# Altium PCB PWR Board 10A.PcbDoc (part 5 of 10)
Units mm, origin at the board's own origin, x right, y up, seen from the top; angles counter-clockwise.
Board outline 355 x 325 mm, 4 copper layers (Top Layer, Layer 1, Layer 2, Bottom Layer), stack 1.636 mm thick; 617 components, 308 nets, 1518 pads, 1199 vias.
Unrouted connection lines stored in the file: 361.
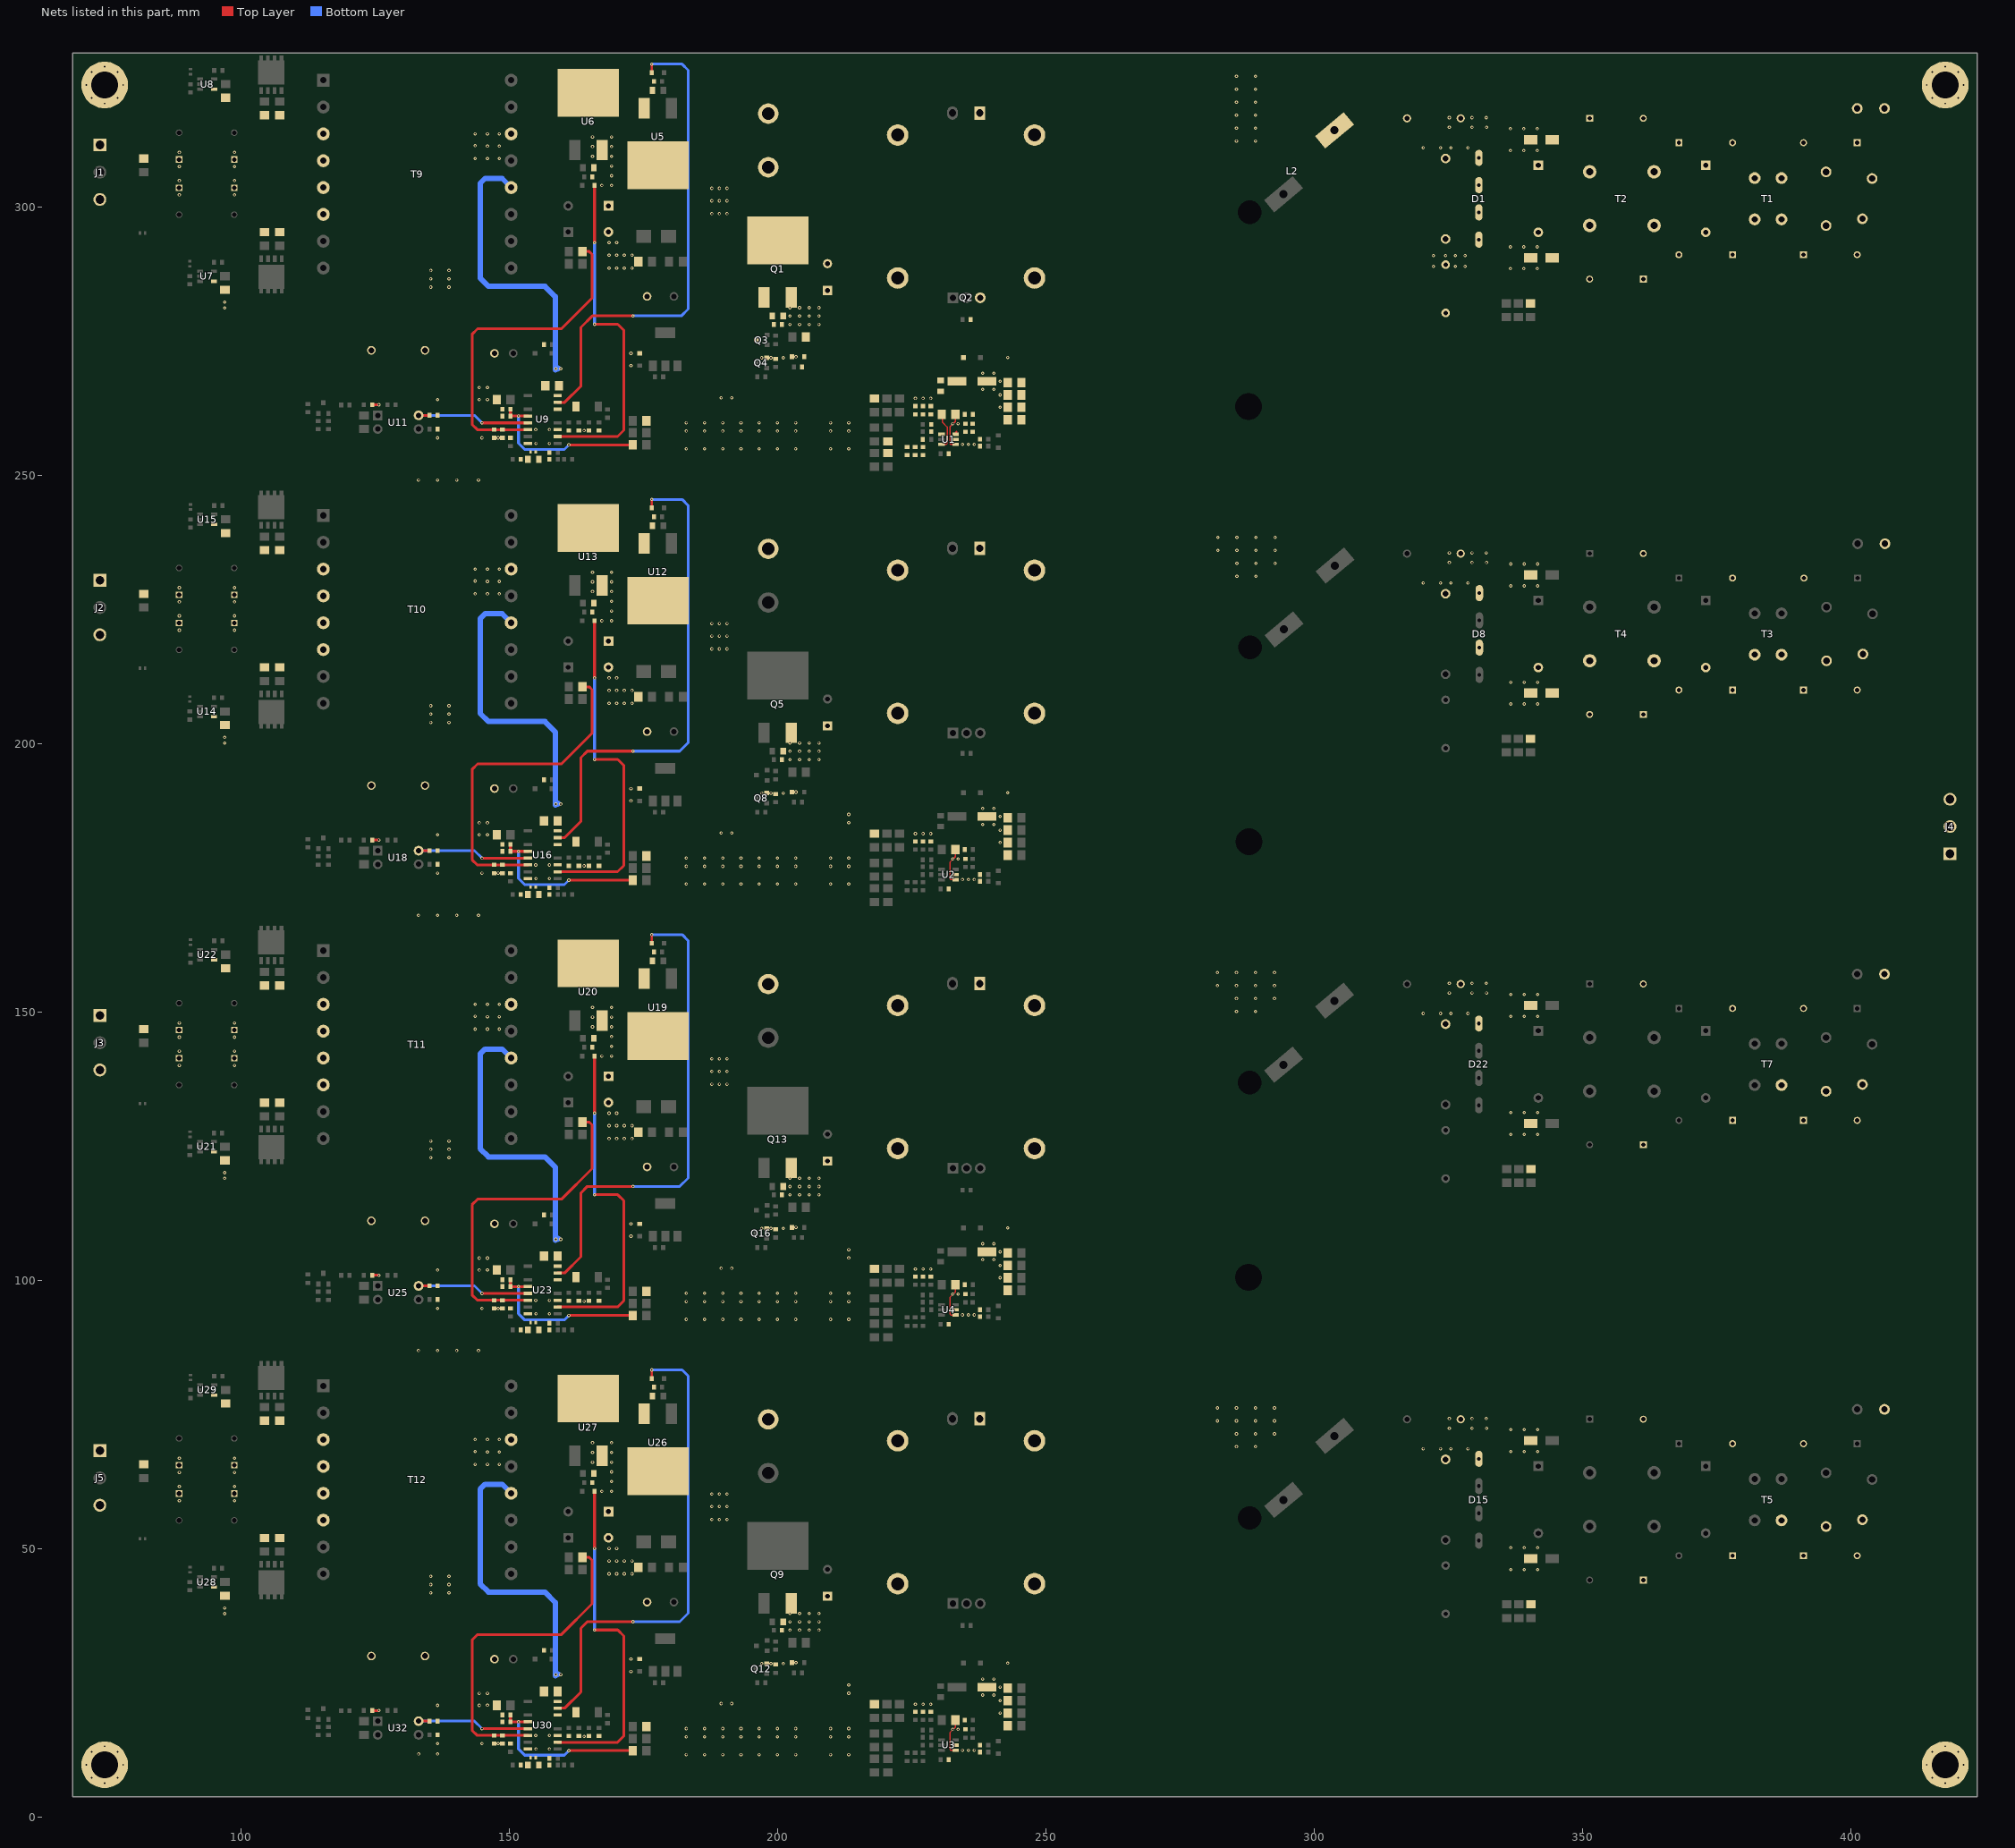
[diagram p4: the nets of this part, all layers, seen from the top]

## Part data (continued)
R120 R150 R180 R210: library part RC0603FR-072R2L, "RES 2.2 OHM 1% 1/10W 0603", Case Code (Imperial)=0603, Case Code (Metric)=1608, LCSC Part Number=C112307, Manufacturer=Yageo, Max Operating Temperature=155°C, Max Power Dissipation=100mW, Min Operating Temperature=-55°C, Package Quantity=1, Resistance Tolerance=1%, Resistor Type="Thick Film", Temperature Coefficient=200ppm/°C, Voltage Rating=50V, Case/Package=0603, ComponentLink1Description=https://datasheet.ciiva.com/11808/0900766b80f96399-11808160.pdf?src-supplier=Rs, ComponentLink1URL=https://datasheet.ciiva.com/11808/0900766b80f96399-11808160.pdf?src-supplier=Rs, ComponentLink2Description=https://datasheet.ciiva.com/2554/pyu-r-int-thick-7-2554421.pdf?src-supplier=Digikey, ComponentLink2URL=https://datasheet.ciiva.com/2554/pyu-r-int-thick-7-2554421.pdf?src-supplier=Digikey, ComponentLink3Description=https://datasheet.ciiva.com/2554/pyu-r-int-thick-7-2554422.pdf?src-supplier=Digikey, ComponentLink3URL=https://datasheet.ciiva.com/2554/pyu-r-int-thick-7-2554422.pdf?src-supplier=Digikey, ComponentLink4Description=https://datasheet.ciiva.com/2554/pyu-r-int-thick-7-2554420.pdf?src-supplier=Digikey, ComponentLink4URL=https://datasheet.ciiva.com/2554/pyu-r-int-thick-7-2554420.pdf?src-supplier=Digikey, Depth=0.8mm, Features="Moisture Resistant", Height=0.022inch, Item Type=Resistors, Lead Free="Lead Free", Length=0.063inch, Manufacturer Part Number=RC0603FR-072R2L, Number of Terminations=2, Packaging="Tape and Reel", Pins=2, Power Rating=100mW, Pricing="1=0.1, 10=0.029, 50=0.0188, 100=0.0158, 500=0.01094, 1000=0.00947 (USD)", Reach SVHC Compliant=No, RoHS=Yes, RoHS Compliant=Yes, Series=RC, Stock=331140, Supplier=Digikey, Technology="THICK FILM", Termination=SMD/SMT, Tolerance=1%, Voltage Rating (DC)=50V, Width=0.031inch
R121 R122 R124 R151 R152 R154 R181 R182 R184 R211 R212 R214: library part RC1206FR-074M99L, "RES 4.99M OHM 1% 1/4W 1206", Case Code (Imperial)=1206, Case Code (Metric)=3216, LCSC Part Number=C488845, Manufacturer=Yageo, Max Operating Temperature=155°C, Max Power Dissipation=250mW, Min Operating Temperature=-55°C, Package Quantity=1, Temperature Coefficient=100ppm/°C, Tolerance=1%, Voltage Rating=200V, Case/Package=1206, ComponentLink1Description=https://datasheet.ciiva.com/2521/pyu-rc1206-51-rohs-l-4-2521020.pdf?src-supplier=Digikey, ComponentLink1URL=https://datasheet.ciiva.com/2521/pyu-rc1206-51-rohs-l-4-2521020.pdf?src-supplier=Digikey, ComponentLink2Description=https://datasheet.ciiva.com/2521/pyu-rc1206-51-rohs-l-4-2521021.pdf?src-supplier=Digikey, ComponentLink2URL=https://datasheet.ciiva.com/2521/pyu-rc1206-51-rohs-l-4-2521021.pdf?src-supplier=Digikey, ComponentLink3Description=https://datasheet.ciiva.com/2521/pyu-rc1206-51-rohs-l-4-2521019.pdf?src-supplier=Digikey, ComponentLink3URL=https://datasheet.ciiva.com/2521/pyu-rc1206-51-rohs-l-4-2521019.pdf?src-supplier=Digikey, Contact Plating=Tin,Matte, Features="Moisture Resistant", Height=0.026inch, Item Type=Resistors, Lead Free="Lead Free", Length=0.122inch, Manufacturer Part Number=RC1206FR-074M99L, Number of Terminations=2, Packaging="Tape and Reel", Power Rating=250mW, Pricing="1=0.1, 10=0.038, 50=0.0244, 100=0.0206, 500=0.01434, 1000=0.01248 (USD)", RoHS=Yes, RoHS Compliant=Yes, Series=RC, Stock=11560, Supplier=Digikey, Termination=SMD/SMT, Voltage Rating (DC)=200V, Width=0.063inch
R123 R153 R183 R213: library part RC0603FR-07274KL, "RES 274K OHM 1% 1/10W 0603", LCSC Part Number=C482818, Manufacturer=Yageo, ComponentLink1Description=https://datasheet.ciiva.com/2454/pyu-r-int-thick-7-2454960.pdf?src-supplier=Digikey, ComponentLink1URL=https://datasheet.ciiva.com/2454/pyu-r-int-thick-7-2454960.pdf?src-supplier=Digikey, ComponentLink2Description=https://datasheet.ciiva.com/2454/pyu-r-int-thick-7-2454961.pdf?src-supplier=Digikey, ComponentLink2URL=https://datasheet.ciiva.com/2454/pyu-r-int-thick-7-2454961.pdf?src-supplier=Digikey, ComponentLink3Description=https://datasheet.ciiva.com/2454/pyu-r-int-thick-7-2454962.pdf?src-supplier=Digikey, ComponentLink3URL=https://datasheet.ciiva.com/2454/pyu-r-int-thick-7-2454962.pdf?src-supplier=Digikey, Item Type=Resistors, Manufacturer Part Number=RC0603FR-07274KL, Pricing="1=0.1, 10=0.019, 50=0.0114, 100=0.0094, 500=0.00632, 1000=0.0054 (USD)", RoHS=Yes, Stock=204071, Supplier=Digikey
R125 R155 R185 R215: library part CRCW0603100RFKEA, "RES SMD 100 OHM 1% 1/10W 0603", Case Code (Imperial)=0603, Case Code (Metric)=1608, LCSC Part Number=C844917, Manufacturer="Vishay Dale", Max Operating Temperature=155°C, Max Power Dissipation=100mW, Min Operating Temperature=-55°C, Package Quantity=10, Ratings=AEC-Q200, Resistance Tolerance=1%, Resistor Type="Thick Film", Temperature Coefficient=100ppm/°C, Voltage Rating=75V, Case/Package=0603, ComponentLink1Description=https://datasheet.ciiva.com/22666/1720486-22666207.pdf?src-supplier=Element14, ComponentLink1URL=https://datasheet.ciiva.com/22666/1720486-22666207.pdf?src-supplier=Element14, ComponentLink2Description=https://datasheet.ciiva.com/26316/fld-crcw-e3-data-en-26316566.pdf?src-supplier=Distrelec, ComponentLink2URL=https://datasheet.ciiva.com/26316/fld-crcw-e3-data-en-26316566.pdf?src-supplier=Distrelec, ComponentLink3Description=https://datasheet.ciiva.com/22673/1697337-22673066.pdf?src-supplier=Element14, ComponentLink3URL=https://datasheet.ciiva.com/22673/1697337-22673066.pdf?src-supplier=Element14, ComponentLink4Description=https://datasheet.ciiva.com/2465/dcrcwe3-2465544.pdf?src-supplier=Digikey, ComponentLink4URL=https://datasheet.ciiva.com/2465/dcrcwe3-2465544.pdf?src-supplier=Digikey, ComponentLink5Description=https://datasheet.ciiva.com/2465/dcrcwe3-2465545.pdf?src-supplier=Digikey, ComponentLink5URL=https://datasheet.ciiva.com/2465/dcrcwe3-2465545.pdf?src-supplier=Digikey, ComponentLink6Description=https://datasheet.ciiva.com/2465/dcrcwe3-2465543.pdf?src-supplier=Digikey, ComponentLink6URL=https://datasheet.ciiva.com/2465/dcrcwe3-2465543.pdf?src-supplier=Digikey, ComponentLink7Description=https://datasheet.ciiva.com/16721/70201119-16721486.pdf?src-supplier=Allied+Electronics, ComponentLink7URL=https://datasheet.ciiva.com/16721/70201119-16721486.pdf?src-supplier=Allied+Electronics, ComponentLink8Description=https://datasheet.ciiva.com/16787/70201119-16787964.pdf?src-supplier=Allied+Electronics, ComponentLink8URL=https://datasheet.ciiva.com/16787/70201119-16787964.pdf?src-supplier=Allied+Electronics, ComponentLink9Description=https://datasheet.ciiva.com/5550/dcrcwe3-109170-5550286.pdf?src-supplier=Mouser, ComponentLink9URL=https://datasheet.ciiva.com/5550/dcrcwe3-109170-5550286.pdf?src-supplier=Mouser, ComponentLink10Description=https://datasheet.ciiva.com/16199/dcrcwe3-16199102.pdf?src-supplier=Future+Electronics, ComponentLink10URL=https://datasheet.ciiva.com/16199/dcrcwe3-16199102.pdf?src-supplier=Future+Electronics, Construction=Rectangular, Depth=0.85mm, Features="Automotive AEC-Q200", Height=0.02inch, Item Type=Resistors, Lead Free=5697LeadFree, Length=1.55mm, Manufacturer Part Number=CRCW0603100RFKEA, Military Standard=Not, Number of Terminations=2, Packaging="Tape and Reel", Pins=2NUMBER, Power Rating=100mW, Pricing="1=0.1, 10=0.017, 50=0.017, 100=0.01, 1000=0.008, 10000=0.004 (USD)", Reach SVHC Compliant=Unknown, RoHS=Yes, RoHS Compliant=Yes, Series=CRCW, Stock=584918, Supplier=Mouser, Termination=SMD/SMT, Tolerance=1%, Voltage Rating (DC)=75V, Weight=7.1E-05oz, Width=0.033inch
R126 R156 R186 R216: library part RT0603BRE07301KL, "RES SMD 301K OHM 0.1% 1/10W 0603", Case/Package=0603, LCSC Part Number=C326750, Manufacturer=Yageo, Max Operating Temperature=125°C, Max Power Dissipation=100mW, Min Operating Temperature=-55°C, Package Quantity=5000, Resistance=301kR, Resistor Type="Thin Film", Supplier Part Number 1=603-RT0603BRE07301KL, Temperature Coefficient=50ppm/°C, Tolerance=0.1%, Voltage Rating (DC)=50V, Category="Chip SMD Resistors", ComponentLink1Description=https://datasheet.ciiva.com/2584/pyu-rt-1-to-0-05-rohs-l-5-2584420.pdf?src-supplier=Digi-Key, ComponentLink1URL=https://datasheet.ciiva.com/2584/pyu-rt-1-to-0-05-rohs-l-5-2584420.pdf?src-supplier=Digi-Key, Height=0.022inch, Item Type=Resistor, Lead Free="Lead Free", Length=0.063inch, Manufacturer Part Number=RT0603BRE07301KL, Number of Terminations=2, Packaging="Tape and Reel", Pricing 1="1=0.42000, 10=0.30200, 50=0.30200, 100=0.12100, 1000=0.06000, 10000=0.04900 (USD)", RoHS=Yes, RoHS Compliant=Yes, Series=RT, Stock 1=2800, Supplier 1=Mouser, Width=0.031inch
R127 R157 R187 R217: library part CRCW060337K4FKEA, "RES SMD 37.4K OHM 1% 1/10W 0603", LCSC Part Number=C844359, Manufacturer=Vishay, ComponentLink1Description=https://datasheet.ciiva.com/5541/dcrcwe3-109170-5541061.pdf?src-supplier=Mouser, ComponentLink1URL=https://datasheet.ciiva.com/5541/dcrcwe3-109170-5541061.pdf?src-supplier=Mouser, ComponentLink2Description=https://datasheet.ciiva.com/22705/1697337-22705851.pdf?src-supplier=Element14, ComponentLink2URL=https://datasheet.ciiva.com/22705/1697337-22705851.pdf?src-supplier=Element14, ComponentLink3Description=https://datasheet.ciiva.com/16770/70201119-16770680.pdf?src-supplier=Allied+Electronics, ComponentLink3URL=https://datasheet.ciiva.com/16770/70201119-16770680.pdf?src-supplier=Allied+Electronics, ComponentLink4Description=https://datasheet.ciiva.com/7671/1697337-7671645.pdf?src-supplier=Element14, ComponentLink4URL=https://datasheet.ciiva.com/7671/1697337-7671645.pdf?src-supplier=Element14, ComponentLink5Description=https://datasheet.ciiva.com/7671/1697337-7671646.pdf?src-supplier=Element14, ComponentLink5URL=https://datasheet.ciiva.com/7671/1697337-7671646.pdf?src-supplier=Element14, ComponentLink6Description=https://datasheet.ciiva.com/3257/dcrcwe3-3257503.pdf?src-supplier=Avnet, ComponentLink6URL=https://datasheet.ciiva.com/3257/dcrcwe3-3257503.pdf?src-supplier=Avnet, ComponentLink7Description=https://datasheet.ciiva.com/7792/125364-7792237.pdf?src-supplier=Element14, ComponentLink7URL=https://datasheet.ciiva.com/7792/125364-7792237.pdf?src-supplier=Element14, ComponentLink8Description=https://datasheet.ciiva.com/16203/dcrcwe3-16203015.pdf?src-supplier=Future+Electronics, ComponentLink8URL=https://datasheet.ciiva.com/16203/dcrcwe3-16203015.pdf?src-supplier=Future+Electronics, ComponentLink9Description=https://datasheet.ciiva.com/2465/dcrcwe3-2465762.pdf?src-supplier=Digikey, ComponentLink9URL=https://datasheet.ciiva.com/2465/dcrcwe3-2465762.pdf?src-supplier=Digikey, ComponentLink10Description=https://datasheet.ciiva.com/2465/dcrcwe3-2465763.pdf?src-supplier=Digikey, ComponentLink10URL=https://datasheet.ciiva.com/2465/dcrcwe3-2465763.pdf?src-supplier=Digikey, ComponentLink11Description=https://datasheet.ciiva.com/2465/dcrcwe3-2465764.pdf?src-supplier=Digikey, ComponentLink11URL=https://datasheet.ciiva.com/2465/dcrcwe3-2465764.pdf?src-supplier=Digikey, ComponentLink12Description=https://datasheet.ciiva.com/8337/dcrcwe3-8337085.pdf?src-supplier=Avnet, ComponentLink12URL=https://datasheet.ciiva.com/8337/dcrcwe3-8337085.pdf?src-supplier=Avnet, Item Type=Resistor, Manufacturer Part Number=CRCW060337K4FKEA, Pricing="1=0.1, 10=0.026, 50=0.0166, 100=0.014, 500=0.00954, 1000=0.00824 (USD)", RoHS=Yes, Stock=9664, Supplier=Digikey
R128 R158 R188 R218: library part CRCW060344K2FKEA, "RES SMD 44.2K OHM 1% 1/10W 0603", LCSC Part Number=C844365, Manufacturer=Vishay, Voltage Rating (DC)=75V, ComponentLink1Description=https://datasheet.ciiva.com/11812/0900766b80d98afc-11812612.pdf?src-supplier=Rs, ComponentLink1URL=https://datasheet.ciiva.com/11812/0900766b80d98afc-11812612.pdf?src-supplier=Rs, ComponentLink2Description=https://datasheet.ciiva.com/2466/dcrcwe3-2466281.pdf?src-supplier=Digikey, ComponentLink2URL=https://datasheet.ciiva.com/2466/dcrcwe3-2466281.pdf?src-supplier=Digikey, ComponentLink3Description=https://datasheet.ciiva.com/2466/dcrcwe3-2466282.pdf?src-supplier=Digikey, ComponentLink3URL=https://datasheet.ciiva.com/2466/dcrcwe3-2466282.pdf?src-supplier=Digikey, ComponentLink4Description=https://datasheet.ciiva.com/2466/dcrcwe3-2466283.pdf?src-supplier=Digikey, ComponentLink4URL=https://datasheet.ciiva.com/2466/dcrcwe3-2466283.pdf?src-supplier=Digikey, ComponentLink5Description=https://datasheet.ciiva.com/15159/getdatasheetpartid-52050-15159597.pdf?src-supplier=Verical, ComponentLink5URL=https://datasheet.ciiva.com/15159/getdatasheetpartid-52050-15159597.pdf?src-supplier=Verical, ComponentLink6Description=https://datasheet.ciiva.com/16507/dcrcwe3-16507773.pdf?src-supplier=Future+Electronics, ComponentLink6URL=https://datasheet.ciiva.com/16507/dcrcwe3-16507773.pdf?src-supplier=Future+Electronics, ComponentLink7Description=https://datasheet.ciiva.com/22705/1697337-22705852.pdf?src-supplier=Element14, ComponentLink7URL=https://datasheet.ciiva.com/22705/1697337-22705852.pdf?src-supplier=Element14, ComponentLink8Description=https://datasheet.ciiva.com/7671/1697337-7671657.pdf?src-supplier=Element14, ComponentLink8URL=https://datasheet.ciiva.com/7671/1697337-7671657.pdf?src-supplier=Element14, ComponentLink9Description=https://datasheet.ciiva.com/7671/1697337-7671658.pdf?src-supplier=Element14, ComponentLink9URL=https://datasheet.ciiva.com/7671/1697337-7671658.pdf?src-supplier=Element14, ComponentLink10Description=https://datasheet.ciiva.com/16772/70201119-16772373.pdf?src-supplier=Allied+Electronics, ComponentLink10URL=https://datasheet.ciiva.com/16772/70201119-16772373.pdf?src-supplier=Allied+Electronics, ComponentLink11Description=https://datasheet.ciiva.com/22872/70201119-22872024.pdf?src-supplier=Allied+Electronics, ComponentLink11URL=https://datasheet.ciiva.com/22872/70201119-22872024.pdf?src-supplier=Allied+Electronics, Item Type=Resistor, Lead Free=5697LeadFree, Manufacturer Part Number=CRCW060344K2FKEA, Pricing="1=0.1, 10=0.026, 50=0.0166, 100=0.014, 500=0.00954, 1000=0.00824 (USD)", RoHS=Yes, Stock=24979, Supplier=Digikey
R129 R159 R189 R219: library part RC0603JR-070RL, "RES 0 OHM JUMPER 1/10W 0603", Case Code (Imperial)=0603, Case Code (Metric)=1608, LCSC Part Number=C95177, Manufacturer=Yageo, Max Operating Temperature=155°C, Max Power Dissipation=100mW, Min Operating Temperature=-55°C, Package Quantity=5000, Resistance=0mR, Resistance Tolerance=5%, Resistor Type="Thick Film", Supplier Part Number 1=311-0.0GRCT-ND, Temperature Coefficient=200ppm/°C, Tolerance=1%, Voltage Rating=50V, Case/Package=0603, Category="Chip SMD Resistors", Construction=Rectangular, Contact Plating=Tin,Matte, Depth=0.8mm, Features="Moisture Resistant", Height=0.45mm, Item Type=Resistor, Lead Free="Lead Free", Length=1.6mm, Manufacturer Part Number=RC0603JR-070RL, Military Standard=Not, Number of Pins=2, Number of Terminations=2, Packaging="Tape and Reel", Power Rating=100mW, Pricing 1="1=0.10000, 10=0.01700, 25=0.01240, 50=0.00960, 100=0.00700, 250=0.00536, 500=0.00430, 1000=0.00316 (USD)", Radiation Hardening=No, Reach SVHC Compliant="No SVHC", RoHS=Yes, RoHS Compliant=Yes, Series=RC, Size Code=0603, Stock 1=18081776, Supplier 1=Digi-Key, Technology="THICK FILM", Termination=SMD/SMT, Voltage Rating (DC)=50V, Width=0.8mm
R130 R131 R160 R161 R190 R191 R220 R221: library part AC0603FR-07324KL, "RES SMD 324K OHM 1% 1/10W 0603", Case Code (Imperial)=0603, Case Code (Metric)=1608, LCSC Part Number=C227818, Manufacturer=Yageo, Max Operating Temperature=155°C, Max Power Dissipation=100mW, Min Operating Temperature=-55°C, Package Quantity=1, Temperature Coefficient=100ppm/°C, Tolerance=1%, Voltage Rating=50V, Case/Package=0603, ComponentLink1Description=http://www.mouser.com/ds/2/447/yageodocoutput-1111992.pdf?src-supplier=Mouser, ComponentLink1URL=http://www.mouser.com/ds/2/447/yageodocoutput-1111992.pdf?src-supplier=Mouser, ComponentLink2Description=https://www.yageo.com/upload/media/product/productsearch/datasheet/rchip/PYu-AC_51_RoHS_L_7.pdf?src-supplier=Digikey, ComponentLink2URL=https://www.yageo.com/upload/media/product/productsearch/datasheet/rchip/PYu-AC_51_RoHS_L_7.pdf?src-supplier=Digikey, Features="Moisture Resistant,Automotive AEC-Q200,Anti-Sulfur", Height=0.022inch, Item Type=Resistors, Length=0.063inch, Manufacturer Part Number=AC0603FR-07324KL, Number of Terminations=2, Packaging="Tape and Reel", Power Rating=100mW, Pricing="1=0.1, 10=0.021, 50=0.013, 100=0.0108, 500=0.00734, 1000=0.00633 (USD)", RoHS=Yes, RoHS Compliant=Yes, Series=AC, Stock=5000, Supplier=Digikey, Termination=SMD/SMT, Width=0.031inch
R132 R162 R192 R222: library part CRCW060320R0FKEA, "RES SMD 20 OHM 1% 1/10W 0603", Case Code (Imperial)=0603, Case Code (Metric)=1608, LCSC Part Number=C844755, Manufacturer=Vishay, Max Operating Temperature=155°C, Max Power Dissipation=100mW, Min Operating Temperature=-55°C, Package Quantity=10, Ratings=AEC-Q200, Resistance Tolerance=1%, Resistor Type="Thick Film", Temperature Coefficient=100ppm/°C, Voltage Rating=75V, Case/Package=0603, ComponentLink1Description=https://datasheet.ciiva.com/11810/0900766b80d98afc-11810778.pdf?src-supplier=Rs, ComponentLink1URL=https://datasheet.ciiva.com/11810/0900766b80d98afc-11810778.pdf?src-supplier=Rs, ComponentLink2Description=https://datasheet.ciiva.com/7748/1533075-7748858.pdf?src-supplier=Element14, ComponentLink2URL=https://datasheet.ciiva.com/7748/1533075-7748858.pdf?src-supplier=Element14, ComponentLink3Description=https://datasheet.ciiva.com/2465/dcrcwe3-2465673.pdf?src-supplier=Digikey, ComponentLink3URL=https://datasheet.ciiva.com/2465/dcrcwe3-2465673.pdf?src-supplier=Digikey, ComponentLink4Description=https://datasheet.ciiva.com/2465/dcrcwe3-2465674.pdf?src-supplier=Digikey, ComponentLink4URL=https://datasheet.ciiva.com/2465/dcrcwe3-2465674.pdf?src-supplier=Digikey, ComponentLink5Description=https://datasheet.ciiva.com/16776/70201119-16776202.pdf?src-supplier=Allied+Electronics, ComponentLink5URL=https://datasheet.ciiva.com/16776/70201119-16776202.pdf?src-supplier=Allied+Electronics, ComponentLink6Description=https://datasheet.ciiva.com/26316/fld-crcw-e3-data-en-26316589.pdf?src-supplier=Distrelec, ComponentLink6URL=https://datasheet.ciiva.com/26316/fld-crcw-e3-data-en-26316589.pdf?src-supplier=Distrelec, ComponentLink7Description=https://datasheet.ciiva.com/2465/dcrcwe3-2465672.pdf?src-supplier=Digikey, ComponentLink7URL=https://datasheet.ciiva.com/2465/dcrcwe3-2465672.pdf?src-supplier=Digikey, ComponentLink8Description=https://datasheet.ciiva.com/16788/70201119-16788011.pdf?src-supplier=Allied+Electronics, ComponentLink8URL=https://datasheet.ciiva.com/16788/70201119-16788011.pdf?src-supplier=Allied+Electronics, ComponentLink9Description=https://datasheet.ciiva.com/5548/dcrcwe3-109170-5548022.pdf?src-supplier=Mouser, ComponentLink9URL=https://datasheet.ciiva.com/5548/dcrcwe3-109170-5548022.pdf?src-supplier=Mouser, ComponentLink10Description=https://datasheet.ciiva.com/3257/dcrcwe3-3257244.pdf?src-supplier=Avnet, ComponentLink10URL=https://datasheet.ciiva.com/3257/dcrcwe3-3257244.pdf?src-supplier=Avnet, ComponentLink11Description=https://datasheet.ciiva.com/16374/dcrcwe3-16374634.pdf?src-supplier=Future+Electronics, ComponentLink11URL=https://datasheet.ciiva.com/16374/dcrcwe3-16374634.pdf?src-supplier=Future+Electronics, ComponentLink12Description=https://datasheet.ciiva.com/3257/dcrcwe3-3257243.pdf?src-supplier=Avnet, ComponentLink12URL=https://datasheet.ciiva.com/3257/dcrcwe3-3257243.pdf?src-supplier=Avnet, Construction=Rectangular, Contact Plating=Tin, Depth=0.85mm, Features="Automotive AEC-Q200", Height=0.45mm, Item Type=Resistors, Lead Free="Lead Free", Length=1.55mm, Manufacturer Part Number=CRCW060320R0FKEA, Military Standard=Not, Number of Terminations=2, Packaging="Tape and Reel", Power Rating=100mW, Pricing="1=0.1, 10=0.026, 50=0.0166, 100=0.014, 500=0.00954, 1000=0.00824 (USD)", Radiation Hardening=No, Reach SVHC Compliant=Unknown, RoHS=Yes, RoHS Compliant=Yes, Series=CRCW, Stock=100733, Supplier=Digikey, Technology="THICK FILM", Termination=SMD/SMT, Tolerance=1%, Voltage Rating (DC)=75V, Weight=7.1E-05oz, Width=0.033inch
R133 R163 R193 R223: library part RC1206FR-0720KL, "RES 20K OHM 1% 1/4W 1206", LCSC Part Number=C114940, Manufacturer=Yageo, Voltage Rating (DC)=200V, ComponentLink1Description=https://datasheet.ciiva.com/11809/0900766b80c6630a-11809460.pdf?src-supplier=Rs, ComponentLink1URL=https://datasheet.ciiva.com/11809/0900766b80c6630a-11809460.pdf?src-supplier=Rs, ComponentLink2Description=https://datasheet.ciiva.com/16746/pyu-rc1206-51-rohs-l-4-16746334.pdf?src-supplier=Future+Electronics, ComponentLink2URL=https://datasheet.ciiva.com/16746/pyu-rc1206-51-rohs-l-4-16746334.pdf?src-supplier=Future+Electronics, Item Type=Resistors, Lead Free=5697LeadFree, Manufacturer Part Number=RC1206FR-0720KL, Pricing="1=0.1, 10=0.038, 50=0.0244, 100=0.0206, 500=0.01434, 1000=0.01248 (USD)", RoHS=Yes, Stock=286094, Supplier=Digikey
R134 R164 R194 R224: library part CRCW060312K4FKEA, "RES SMD 12.4K OHM 1% 1/10W 0603", Case Code (Imperial)=0603, Case Code (Metric)=1608, Case/Package=345Case, LCSC Part Number=C844524, Manufacturer=Vishay, Max Operating Temperature=155°C, Min Operating Temperature=-55°C, Power Rating=100mW, Resistance Tolerance=1%, Resistor Type="Thick Film", Temperature Coefficient=100ppm/°C, Voltage Rating=75V, ComponentLink1Description=http://www.farnell.com/datasheets/2310790.pdf?src-supplier=Farnell, ComponentLink1URL=http://www.farnell.com/datasheets/2310790.pdf?src-supplier=Farnell, ComponentLink2Description=https://datasheet.octopart.com/CRCW060312K4FKEA-Vishay-datasheet-62317933.pdf?src-supplier=Element14, ComponentLink2URL=https://datasheet.octopart.com/CRCW060312K4FKEA-Vishay-datasheet-62317933.pdf?src-supplier=Element14, ComponentLink3Description=http://www.farnell.com/datasheets/2310790.pdf?src-supplier=Newark, ComponentLink3URL=http://www.farnell.com/datasheets/2310790.pdf?src-supplier=Newark, ComponentLink4Description=https://datasheet.octopart.com/CRCW060312K4FKEA-Vishay-datasheet-5300368.pdf?src-supplier=Future+Electronics, ComponentLink4URL=https://datasheet.octopart.com/CRCW060312K4FKEA-Vishay-datasheet-5300368.pdf?src-supplier=Future+Electronics, ComponentLink5Description=http://www.farnell.com/datasheets/2310790.pdf?src-supplier=Element14, ComponentLink5URL=http://www.farnell.com/datasheets/2310790.pdf?src-supplier=Element14, ComponentLink6Description=https://datasheet.octopart.com/CRCW060312K4FKEA-Vishay-datasheet-83961561.pdf?src-supplier=Newark, ComponentLink6URL=https://datasheet.octopart.com/CRCW060312K4FKEA-Vishay-datasheet-83961561.pdf?src-supplier=Newark, Height=500um, Item Type=Resistors, Lead Free=5697LeadFree, Manufacturer Part Number=CRCW060312K4FKEA, Packaging=13Packaging, Pins=2NUMBER, Pricing="1=0.1, 10=0.026, 50=0.0166, 100=0.014, 500=0.00954, 1000=0.00824 (USD)", RoHS=Yes, RoHS Compliant=Yes, Stock=12301, Supplier=Digikey, Tolerance=1%
RT1 RT2 RT3 RT4: "ICL 10 OHM 20% 3.5A 11.5MM", Current Rating=3.5A, LCSC Part Number=C125458, Manufacturer="TDK EPCOS", Tolerance=20%, ComponentLink1Description=https://datasheet.ciiva.com/15097/getdatasheetpartid-119550-15097692.pdf?src-supplier=Verical, ComponentLink1URL=https://datasheet.ciiva.com/15097/getdatasheetpartid-119550-15097692.pdf?src-supplier=Verical, ComponentLink2Description=https://datasheet.ciiva.com/1321/1851770-1321676.pdf?src-supplier=Element14, ComponentLink2URL=https://datasheet.ciiva.com/1321/1851770-1321676.pdf?src-supplier=Element14, Diameter=11.5mm, Item Type=Thermistors, Lead Free=5697LeadFree, Manufacturer Part Number=B57236S0100M000, Pricing="1=0.84, 10=0.78, 50=0.646, 100=0.572, 1000=0.44, 10000=0.373 (USD)", RoHS=Yes, Stock=2235, Supplier=Mouser, Thickness=6mm
T1 T3 T5 T7: "CMC 1MH 3A 2LN TH", Manufacturer="Wurth Electronics", Supplier Part Number=732-1439-ND, ComponentLink1Description=https://datasheet.ciiva.com/4952/744822301-91864-4952415.pdf?src-supplier=Mouser, ComponentLink1URL=https://datasheet.ciiva.com/4952/744822301-91864-4952415.pdf?src-supplier=Mouser, ComponentLink2Description=https://datasheet.ciiva.com/11796/0900766b804ac271-11796688.pdf?src-supplier=Rs, ComponentLink2URL=https://datasheet.ciiva.com/11796/0900766b804ac271-11796688.pdf?src-supplier=Rs, ComponentLink3Description=https://datasheet.ciiva.com/7211/70388-7211253.pdf?src-supplier=Newark, ComponentLink3URL=https://datasheet.ciiva.com/7211/70388-7211253.pdf?src-supplier=Newark, ComponentLink4Description=https://datasheet.ciiva.com/7754/1736520-7754735.pdf?src-supplier=Element14, ComponentLink4URL=https://datasheet.ciiva.com/7754/1736520-7754735.pdf?src-supplier=Element14, ComponentLink5Description=https://datasheet.ciiva.com/6216/744822301-6216281.pdf?src-supplier=Digikey, ComponentLink5URL=https://datasheet.ciiva.com/6216/744822301-6216281.pdf?src-supplier=Digikey, Item Type=Inductor, Manufacturer Part Number=744822301, Pricing="1=4.57, 10=4.5, 50=3.57, 140=3.41, 280=3.1 (USD)", RoHS=Yes, Stock=1589, Supplier=Digikey
T2 T4 T6 T8: "CMC 10MH 3A 2LN TH", Case/Package=L, Current=3A, DC Resistance (DCR)=105mR, Inductance Tolerance=30%, Manufacturer="Wurth Electronics", Max Operating Temperature=125°C, Min Operating Temperature=-40°C, Package Quantity=200, Supplier Part Number=732-1452-ND, Test Frequency=10kHz, ComponentLink1Description=https://datasheet.ciiva.com/11796/0900766b804acf58-11796710.pdf?src-supplier=Rs, ComponentLink1URL=https://datasheet.ciiva.com/11796/0900766b804acf58-11796710.pdf?src-supplier=Rs, ComponentLink2Description=https://datasheet.ciiva.com/4952/744824310-39306-4952431.pdf?src-supplier=Mouser, ComponentLink2URL=https://datasheet.ciiva.com/4952/744824310-39306-4952431.pdf?src-supplier=Mouser, ComponentLink3Description=https://datasheet.ciiva.com/6214/744824310-6214810.pdf?src-supplier=Digikey, ComponentLink3URL=https://datasheet.ciiva.com/6214/744824310-6214810.pdf?src-supplier=Digikey, ComponentLink4Description=https://datasheet.ciiva.com/7211/70411-7211262.pdf?src-supplier=Newark, ComponentLink4URL=https://datasheet.ciiva.com/7211/70411-7211262.pdf?src-supplier=Newark, ComponentLink5Description=https://datasheet.ciiva.com/7754/1736534-7754741.pdf?src-supplier=Element14, ComponentLink5URL=https://datasheet.ciiva.com/7754/1736534-7754741.pdf?src-supplier=Element14, ComponentLink6Description=https://datasheet.ciiva.com/48690/001088035-da-01-ml-we-cmb-stromkomp-netzdrossel-74482-de-en-48690603.pdf?src-supplier=Conrad, ComponentLink6URL=https://datasheet.ciiva.com/48690/001088035-da-01-ml-we-cmb-stromkomp-netzdrossel-74482-de-en-48690603.pdf?src-supplier=Conrad, Current Rating=3A, Depth=18.5mm, Height=33mm, Item Type="Common Mode Chokes", Lead Free="Lead Free", Lead Pitch=10mm, Length=27.5mm, Manufacturer Part Number=744824310, Max DC Current=3A, Mounting Technology="Through Hole,Radial", Number of Lines=2, Packaging=Bulk, Pins=4, Pricing="1=5.63, 10=5.54, 100=4.39, 250=4.2, 500=3.82 (USD)", Reach SVHC Compliant=No, RoHS=Yes, RoHS Compliant=Yes, Series=WE-CMB, Stock=278, Supplier=Digikey, Termination=Radial, Tolerance=30%, Width=18.5mm
T9 T10 T11 T12: "XFMR RES CONV AC/DC 400UH TH", Current Rating=10.4A, Frequency=120kHz, Manufacturer="Wurth Electronics", Max Operating Temperature=125°C, Min Operating Temperature=-40°C, Output Voltage=24V, Package Quantity=20, Power Rating=250W, Supplier Part Number=732-5069-ND, ComponentLink1Description=https://datasheet.ciiva.com/24142/760895741-270531-24142074.pdf?src-supplier=Mouser, ComponentLink1URL=https://datasheet.ciiva.com/24142/760895741-270531-24142074.pdf?src-supplier=Mouser, ComponentLink2Description=https://datasheet.ciiva.com/29632/760895741-29632482.pdf?src-supplier=Digikey, ComponentLink2URL=https://datasheet.ciiva.com/29632/760895741-29632482.pdf?src-supplier=Digikey, Height=27.5mm, Item Type=Transformer, Length=48mm, Manufacturer Part Number=760895741, Mounting Technology="Through Hole", Output Current=10.4A, Packaging=Tray, Pricing="1=22.74, 10=21.792, 50=20.43, 100=18.3881, 500=15.66304 (USD)", RoHS=Yes, RoHS Compliant=Yes, Series=WE-LLCR, Shielding=Unshielded, Stock=7, Supplier=Digikey, Termination=Solder, Width=35mm
U1 U2 U3 U4: "IC PFC CTRLR TRANSITION SOT23-6", LCSC Part Number=C2868631, Manufacturer="Texas Instruments", Package=SOT-23-6, ComponentLink1Description=LCSC, ComponentLink1URL=https://www.lcsc.com/product-detail/AC-DC-Controllers-Regulators_Texas-Instruments-UCC28056DBVT_C2868631.html, Item Type=IC, Manufacturer Part Number=UCC28056DBVT
U5 U6 U12 U13 U19 U20 U26 U27: "MOSFET N-CH 650V 22.4A D2PAK", Case/Package=TO-263-3, LCSC Part Number=C536639, Manufacturer=Infineon, Halogen Free="Halogen Free", Item Type=Mosfet, Manufacturer Part Number=IPB65R150CFDA, Packaging="Tape and Reel", Pins=3, Pricing="1000=2.73 (USD)", Stock=1000, Supplier="Future Electronics"
U7 U8 U14 U15 U21 U22 U28 U29: "SYNC RECTIFIER FLYBACK", LCSC Part Number=C471044, Manufacturer="Texas Instruments", ComponentLink1Description=http://www.ti.com/general/docs/suppproductinfo.tsp?distId=10&amp;gotoUrl=http%3A%2F%2Fwww.ti.com%2Flit%2Fgpn%2Fucc24612&src-supplier=Digikey, ComponentLink1URL=http://www.ti.com/general/docs/suppproductinfo.tsp?distId=10&amp;gotoUrl=http%3A%2F%2Fwww.ti.com%2Flit%2Fgpn%2Fucc24612&src-supplier=Digikey, Height=1.45mm, Item Type=IC, Length=2.9mm, Manufacturer Part Number=UCC24612-2DBVR, Pins=5NUMBER, Pricing="1=0.92, 10=0.758, 50=0.758, 100=0.575, 1000=0.392, 10000=0.317 (USD)", RoHS=Yes, Stock=6284, Supplier=Mouser, Thickness=1.2mm, Width=1.6mm
U9 U16 U23 U30: "HALF BRIDGE CONT WITH HV DRIVER", LCSC Part Number=C2867939, Manufacturer="Texas Instruments", ComponentLink1Description=http://www.ti.com/general/docs/suppproductinfo.tsp?distId=10&amp;gotoUrl=http%3A%2F%2Fwww.ti.com%2Flit%2Fgpn%2Fucc256402&src-supplier=Digikey, ComponentLink1URL=http://www.ti.com/general/docs/suppproductinfo.tsp?distId=10&amp;gotoUrl=http%3A%2F%2Fwww.ti.com%2Flit%2Fgpn%2Fucc256402&src-supplier=Digikey, Item Type=IC, Manufacturer Part Number=UCC256404DDBR, Pricing="1=2.34, 10=1.99, 50=1.99, 100=1.69, 1000=1.15, 10000=0.981 (USD)", RoHS=Yes, Stock=2756, Supplier=Mouser
U10 U17 U24 U31: "IC VREF SHUNT ADJ 1% SOT23-3", LCSC Part Number=C1852128, Manufacturer="Texas Instruments", ComponentLink1Description=http://www.ti.com/general/docs/suppproductinfo.tsp?distId=10&amp;gotoUrl=http%3A%2F%2Fwww.ti.com%2Flit%2Fgpn%2Fatl431li-q1&src-supplier=Digikey, ComponentLink1URL=http://www.ti.com/general/docs/suppproductinfo.tsp?distId=10&amp;gotoUrl=http%3A%2F%2Fwww.ti.com%2Flit%2Fgpn%2Fatl431li-q1&src-supplier=Digikey, Item Type=IC, Manufacturer Part Number=ATL432LIAQDBZRQ1, Pricing="1=0.61, 10=0.523, 25=0.488, 100=0.3903, 250=0.3624, 500=0.30664, 1000=0.23695 (USD)", RoHS=Yes, Stock=1265, Supplier=Digikey
U11 U18 U25 U32: "Optocoupler DC-IN 1-CH Transistor DC-OUT 4-Pin PDIP", LCSC Part Number=C142630, Manufacturer="Vishay Semiconductors", ComponentLink1Description=https://datasheet.ciiva.com/26941/getdatasheetpartid-641306-26941970.pdf?src-supplier=Verical, ComponentLink1URL=https://datasheet.ciiva.com/26941/getdatasheetpartid-641306-26941970.pdf?src-supplier=Verical, ComponentLink2Description=https://datasheet.ciiva.com/2087/vo618a-2087569.pdf?src-supplier=Digikey, ComponentLink2URL=https://datasheet.ciiva.com/2087/vo618a-2087569.pdf?src-supplier=Digikey, ComponentLink3Description=https://datasheet.ciiva.com/8086/vo618a-8086102.pdf?src-supplier=Avnet, ComponentLink3URL=https://datasheet.ciiva.com/8086/vo618a-8086102.pdf?src-supplier=Avnet, Item Type=Optocouplers, Manufacturer Part Number=VO618A-3, Pricing="1=0.46, 10=0.283, 100=0.1626, 1000=0.12726, 2000=0.11666, 5000=0.10605, 10000=0.09898, 25000=0.09544 (USD)", RoHS=Yes, Stock=6419, Supplier=Digikey
VR1 VR2 VR3 VR4: "VARISTOR 430V 3.5KA DISC 10MM", Case/Package=Radial, Clamping Current=25A, Clamping Voltage=710V, Flammability Rating=5813Flammability, LCSC Part Number=C210564, Manufacturer="TDK EPCOS", Max Operating Temperature=85°C, Max Surge Current=3.5kA, Max Varistor Voltage=473V, Max Voltage Rating (AC)=275V, Max Voltage Rating (DC)=350V, Min Operating Temperature=-40°C, Min Varistor Voltage=387V, Power Rating=400mW, Tolerance=10%, Varistor Voltage=430V, ComponentLink1Description=http://www.farnell.com/datasheets/1680955.pdf?src-supplier=Farnell, ComponentLink1URL=http://www.farnell.com/datasheets/1680955.pdf?src-supplier=Farnell, ComponentLink2Description=http://www.farnell.com/datasheets/2311597.pdf?src-supplier=Farnell, ComponentLink2URL=http://www.farnell.com/datasheets/2311597.pdf?src-supplier=Farnell, ComponentLink3Description=http://components.arrow.com/part/dataview/30869957S9461734N9769?src-supplier=Arrow+Electronics, ComponentLink3URL=http://components.arrow.com/part/dataview/30869957S9461734N9769?src-supplier=Arrow+Electronics, ComponentLink4Description=http://www.farnell.com/datasheets/1680955.pdf?src-supplier=Element14, ComponentLink4URL=http://www.farnell.com/datasheets/1680955.pdf?src-supplier=Element14, ComponentLink5Description=http://www.farnell.com/datasheets/2311597.pdf?src-supplier=Newark, ComponentLink5URL=http://www.farnell.com/datasheets/2311597.pdf?src-supplier=Newark, ComponentLink6Description=http://datasheet.octopart.com/B72210S2271K101-EPCOS-datasheet-11546246.pdf?src-supplier=Distrelec, ComponentLink6URL=http://datasheet.octopart.com/B72210S2271K101-EPCOS-datasheet-11546246.pdf?src-supplier=Distrelec, ComponentLink7Description=https://en.tdk.eu/inf/70/db/var/SIOV_Leaded_AdvanceD.pdf?src-supplier=Digikey, ComponentLink7URL=https://en.tdk.eu/inf/70/db/var/SIOV_Leaded_AdvanceD.pdf?src-supplier=Digikey, ComponentLink8Description=https://datasheet.octopart.com/S10K275E2-EPCOS-datasheet-5104.pdf?src-supplier=Future+Electronics, ComponentLink8URL=https://datasheet.octopart.com/S10K275E2-EPCOS-datasheet-5104.pdf?src-supplier=Future+Electronics, ComponentLink9Description=http://datasheet.octopart.com/B72210S2271K101-EPCOS-datasheet-11546246.pdf?src-supplier=Mouser, ComponentLink9URL=http://datasheet.octopart.com/B72210S2271K101-EPCOS-datasheet-11546246.pdf?src-supplier=Mouser, ComponentLink10Description=https://datasheet.octopart.com/B72210S2271K101-EPCOS-datasheet-11546246.pdf?src-supplier=Newark, ComponentLink10URL=https://datasheet.octopart.com/B72210S2271K101-EPCOS-datasheet-11546246.pdf?src-supplier=Newark, ComponentLink11Description=http://datasheet.octopart.com/B72210S2271K101-EPCOS-datasheet-11546246.pdf?src-supplier=Avnet, ComponentLink11URL=http://datasheet.octopart.com/B72210S2271K101-EPCOS-datasheet-11546246.pdf?src-supplier=Avnet, ComponentLink12Description=http://www.epcos.com/inf/70/db/var_08/SIOV_Leaded_StandarD.pdf?src-supplier=Future+Electronics, ComponentLink12URL=http://www.epcos.com/inf/70/db/var_08/SIOV_Leaded_StandarD.pdf?src-supplier=Future+Electronics, ComponentLink13Description=http://datasheet.octopart.com/B72210S2271K101-EPCOS-datasheet-11546246.pdf?src-supplier=Verical, ComponentLink13URL=http://datasheet.octopart.com/B72210S2271K101-EPCOS-datasheet-11546246.pdf?src-supplier=Verical, ComponentLink14Description=http://datasheet.octopart.com/B72210S2271K101-EPCOS-datasheet-11546246.pdf?src-supplier=TME, ComponentLink14URL=http://datasheet.octopart.com/B72210S2271K101-EPCOS-datasheet-11546246.pdf?src-supplier=TME, ComponentLink15Description=http://datasheet.octopart.com/B72210S2271K101-EPCOS-datasheet-11546246.pdf?src-supplier=TTI, ComponentLink15URL=http://datasheet.octopart.com/B72210S2271K101-EPCOS-datasheet-11546246.pdf?src-supplier=TTI, ComponentLink16Description=http://datasheet.octopart.com/B72210S2271K101-EPCOS-datasheet-11546246.pdf?src-supplier=Rutronik, ComponentLink16URL=http://datasheet.octopart.com/B72210S2271K101-EPCOS-datasheet-11546246.pdf?src-supplier=Rutronik, Contact Plating=154ConductorMaterial, Current Rating=25A, Depth=5.4mm, Diameter=12mm, Energy=55J, ESD Protection=5898YesNo, Height=14.5mm, Item Type=Varistors, Lead Pitch=7.5mm, Lead/Base Style=Radial, Manufacturer Part Number=B72210S2271K101, Material=4240ConductorMaterial, Mounting Technology="Through Hole", Number of Circuits=1, Packaging=Bulk, Pricing="1=0.12365, 10=0.12192, 30=0.12018, 50=0.11845, 100=0.11671 (USD)", Radiation Hardening=5898YesNo, Reach SVHC Compliant=Unknown, RoHS=Yes, RoHS Compliant=Yes, Series=AdvanceD, Stock=5700, Supplier=Avnet, Termination=4745ConnectorType, Voltage Rating=350V, Voltage Rating (AC)=275V, Voltage Rating (DC)=350V, Voltage Tolerance=10%, Weight=2.000002g

## Free pads (board coordinates)
  round 8.72 hole 5: MH(74.617,9.682) MH(74.617,322.682) MH(417.618,9.682) MH(417.618,322.682)
  round 0 hole 5 unplated: MH1(287.743,100.545) MH1(287.743,262.749) MH1(287.83,181.646)

## Via types
v1: diameter 0.6, hole 0.3, Top Layer to Bottom Layer, 1199 vias

## Nets (pads, with @x,y where several pads share a name; then routed paths per layer and width w, separated by ;. In a path a pad name is that pad's centre, name@x,y a point inside that pad or via, vN(x,y) a via of type N, cw(c..) or ccw(c..) an arc to the next point about the centre after c; other vN are vias at no path point)
24VDC-C1: C93.2 C95.1 C96.1 C97.1 C98.1 C99.1 C100.1 C101.2 C107.2 C108.2 C110.2 C112.2 J1.1 R132.2 T9.3 T9.4 T9.5 T9.6 U7.4 U8.4 | length 1.2
  Top Layer w0.508: R132.2@124.46,263.095 v1(125.705,263.095)
  other v1: 96.977,281.153 96.977,282.219 88.536,302.2 98.808,302.2 88.536,304.862 98.808,304.862 88.536,307.462 98.808,307.462 88.536,310.123 98.808,310.123
24VDC-C2: C128.2 C130.1 C131.1 C132.1 C133.1 C134.1 C135.1 C136.2 C142.2 C143.2 C145.2 C147.2 J2.1 R162.2 T10.3 T10.4 T10.5 T10.6 U14.4 U15.4 | length 1.2
  Top Layer w0.508: R162.2@124.46,181.993 v1(125.704,181.993)
  other v1: 96.977,200.05 96.977,201.117 88.536,221.098 98.808,221.098 88.536,223.759 98.808,223.759 88.536,226.36 98.808,226.36 88.536,229.021 98.808,229.021
24VDC-C3: C163.2 C165.1 C166.1 C167.1 C168.1 C169.1 C170.1 C171.2 C177.2 C178.2 C180.2 C182.2 J3.1 R192.2 T11.3 T11.4 T11.5 T11.6 U21.4 U22.4 | length 1.2
  Top Layer w0.508: R192.2@124.46,100.89 v1(125.704,100.89)
  other v1: 96.977,118.948 96.977,120.015 88.536,139.996 98.808,139.996 88.536,142.657 98.808,142.657 88.536,145.257 98.808,145.257 88.536,147.919 98.808,147.919
24VDC-C4: C198.2 C200.1 C201.1 C202.1 C203.1 C204.1 C205.1 C206.2 C212.2 C213.2 C215.2 C217.2 J5.1 R222.2 T12.3 T12.4 T12.5 T12.6 U28.4 U29.4 | length 1.2
  Top Layer w0.508: R222.2@124.46,19.788 v1(125.704,19.788)
  other v1: 96.977,37.846 96.977,38.912 88.536,58.893 98.808,58.893 88.536,61.555 98.808,61.555 88.536,64.155 98.808,64.155 88.536,66.816 98.808,66.816
AC_L: F1.1 F2.1 F3.1 F4.1 J4.1
AC_N: C1.2 C6.2 C24.2 C29.2 C47.2 C52.2 C70.2 C75.2 J4.3 T1.1 T3.1 T5.1 T7.1 VR1.2 VR2.2 VR3.2 VR4.2
BLK-C1: C125.2 R124.1 R128.2 U9.4 | length 31.9
  Top Layer w0.508: R128.2@150.237,262.262 C125.2@150.237,260.992 v1(151.736,260.992) U9.4@153.486,260.992 ; v1(161.112,255.612) 172.897,255.612 R124.1@173.189,255.612
  Bottom Layer w0.508: v1(151.736,260.992) 151.736,255.942 152.906,254.773 160.273,254.773 v1(161.112,255.612)
BLK-C2: C160.2 R154.1 R158.2 U16.4 | length 31.9
  Top Layer w0.508: R158.2@150.237,181.16 150.237,179.89 v1(151.736,179.89) U16.4@153.486,179.89 ; v1(161.112,174.51) 172.897,174.51 R154.1@173.189,174.51
  Bottom Layer w0.508: v1(151.736,179.89) 151.736,174.84 152.906,173.67 160.273,173.67 v1(161.112,174.51)
BLK-C3: C195.2 R184.1 R188.2 U23.4 | length 31.9
  Top Layer w0.508: R188.2@150.237,100.057 C195.2@150.237,98.787 v1(151.736,98.787) U23.4@153.486,98.787 ; v1(161.112,93.407) R184.1@173.189,93.407
  Bottom Layer w0.508: v1(151.736,98.787) 151.736,93.737 152.906,92.568 160.273,92.568 v1(161.112,93.407)
BLK-C4: C230.2 R214.1 R218.2 U30.4 | length 31.9
  Top Layer w0.508: R218.2@150.237,18.955 C230.2@150.237,17.685 v1(151.736,17.685) U30.4@153.486,17.685 ; v1(161.112,12.305) R214.1@173.189,12.305
  Bottom Layer w0.508: v1(151.736,17.685) 151.736,12.635 152.906,11.466 160.273,11.466 v1(161.112,12.305)
BW-C1: C123.2 R108.1 R112.2 U9.8
BW-C2: C158.2 R138.1 R142.2 U16.8
BW-C3: C193.2 R168.1 R172.2 U23.8
BW-C4: C228.2 R198.1 R202.2 U30.8
DRV-C1: R5.1 R8.1 U1.5
DRV-C2: R31.1 R34.1 U2.5
DRV-C3: R83.1 R86.1 U4.5
DRV-C4: R57.1 R60.1 U3.5
EARTH: C1.1 C2.1 C3.1 C9.2 C10.2 C11.2 C24.1 C25.1 C26.1 C32.2 C33.2 C34.2 C47.1 C48.1 C49.1 C55.2 C56.2 C57.2 C70.1 C71.1 C72.1 C78.2 C79.2 C80.2 J1.3 J2.3 J3.3 J4.2 J5.3 pad.MH
  other v1: 74.617,6.24 417.618,6.24 72.183,7.248 77.05,7.248 415.184,7.248 420.052,7.248 71.175,9.682 78.059,9.682 414.176,9.682 421.06,9.682 72.183,12.116 77.05,12.116 415.184,12.116 420.052,12.116 74.617,13.124 417.618,13.124 74.617,319.24 417.618,319.24 72.183,320.248 77.05,320.248 415.184,320.248 420.052,320.248 71.175,322.682 78.059,322.682 414.176,322.682 421.06,322.682 72.183,325.116 77.05,325.116 415.184,325.116 420.052,325.116 74.617,326.124 417.618,326.124
FB-C1: C127.1 U9.5 U11.4 | length 22.9
  Top Layer w0.508: U11.4@133.121,261.119 C127.1@135.128,261.119 ; v1(144.932,259.722) U9.5@153.486,259.722
  Bottom Layer w0.508: U11.4@133.121,261.119 143.536,261.119 v1(144.932,259.722)
FB-C2: C162.1 U16.5 U18.4 | length 22.9
  Top Layer w0.508: U18.4@133.121,180.016 C162.1@135.128,180.016 ; v1(144.932,178.62) U16.5@153.486,178.62
  Bottom Layer w0.508: U18.4@133.121,180.016 143.536,180.016 v1(144.932,178.62)
FB-C3: C197.1 U23.5 U25.4 | length 22.9
  Top Layer w0.508: U25.4@133.121,98.914 C197.1@135.128,98.914 ; v1(144.932,97.517) U23.5@153.486,97.517
  Bottom Layer w0.508: U25.4@133.121,98.914 143.536,98.914 v1(144.932,97.517)
FB-C4: C232.1 U30.5 U32.4 | length 22.9
  Top Layer w0.508: U32.4@133.121,17.812 C232.1@135.128,17.812 ; v1(144.932,16.415) U30.5@153.486,16.415
  Bottom Layer w0.508: U32.4@133.121,17.812 143.536,17.812 v1(144.932,16.415)
GND: C4.1 C5.1 C13.1 C18.1 C20.1 C21.2 C22.1 C23.2 C27.1 C28.1 C36.1 C41.1 C43.1 C44.2 C45.1 C46.2 C50.1 C51.1 C59.1 C64.1 C66.1 C67.2 C68.1 C69.2 C73.1 C74.1 C82.1 C87.1 C89.1 C90.2 C91.1 C92.2 C93.1 C102.2 C105.2 C106.1 C114.1 C115.1 C116.1 C117.1 C118.2 C119.1 C120.2 C121.1 C122.1 C123.1 C124.1 C125.1 C127.2 C128.1 C137.2 C140.2 C141.1 C149.1 C150.1 C151.1 C152.1 C153.2 C154.1 C155.2 C156.1 C157.1 C158.1 C159.1 C160.1 C162.2 C163.1 C172.2 C175.2 C176.1 C184.1 C185.1 C186.1 C187.1 C188.2 C189.1 C190.2 C191.1 C192.1 C193.1 C194.1 C195.1 C197.2 C198.1 C207.2 C210.2 C211.1 C219.1 C220.1 C221.1 C222.1 C223.2 C224.1 C225.2 C226.1 C227.1 C228.1 C229.1 C230.1 C232.2 D1.4 D7.2 D8.4 D14.2 D15.4 D21.2 D22.4 D28.2 D32.2 D38.2 D44.2 D50.2 Designator26.1 Designator26.2 Designator26_1.1 Designator26_1.2 Designator26_1_1.1 Designator26_1_1.2 Designator26_1_1_1.1 Designator26_1_1_1.2 Designator27.1 Designator27.2 Designator27_1.1 Designator27_1.2 Designator27_1_1.1 Designator27_1_1.2 Designator27_1_1_1.1 Designator27_1_1_1.2 Q1.3 Q4.2 Q5.3 Q8.2 Q9.3 Q12.2 Q13.3 Q16.2 R2.1 R17.1 R18.1 R20.1 R21.2 R22.2 R23.1 R24.1 R26.1 R28.1 R43.1 R44.1 R46.1 R47.2 R48.2 R49.1 R50.1 R52.1 R54.1 R69.1 R70.1 R72.1 R73.2 R74.2 R75.1 R76.1 R78.1 R80.1 R95.1 R96.1 R98.1 R99.2 R100.2 R101.1 R102.1 R104.1 R111.2 R112.1 R125.1 R126.1 R128.1 R129.1 R141.2 R142.1 R155.1 R156.1 R158.1 R159.1 R171.2 R172.1 R185.1 R186.1 R188.1 R189.1 R201.2 R202.1 R215.1 R216.1 R218.1 R219.1 RT1.1 RT2.1 RT3.1 RT4.1 T9.14 T10.14 T11.14 T12.14 U1.4 U2.4 U3.4 U4.4 U6.3 U9.11 U13.3 U16.11 U20.3 U23.11 U27.3 U30.11 | length 28
  Top Layer w0.254: C66.1@233.149,18.02 233.149,16.675 232.133,15.659 232.133,12.581 232.312,12.402 U3.4@233.189,12.402 ; C89.1@233.149,99.123 233.149,97.777 232.133,96.761 232.133,93.683 232.312,93.504 U4.4@233.189,93.504 ; C43.1@233.149,180.225 233.149,178.88 232.133,177.864 232.133,174.786 232.312,174.607 U2.4@233.189,174.607 ; C20.1@233.149,261.327 233.149,259.982 232.133,258.966 232.133,255.888 232.312,255.709 U1.4@233.189,255.709